# Altium PCB DIO_8SMA_8MCX.PcbDoc (part 5 of 9)
Units mm, origin at the board's own origin, x right, y up, seen from the top; angles counter-clockwise.
Board outline 222.9 x 100 mm, 6 copper layers (TopLayer, L2, L3, L4, L5, Bottom Layer), stack 1.492 mm thick; 542 components, 326 nets, 1968 pads, 1583 vias.
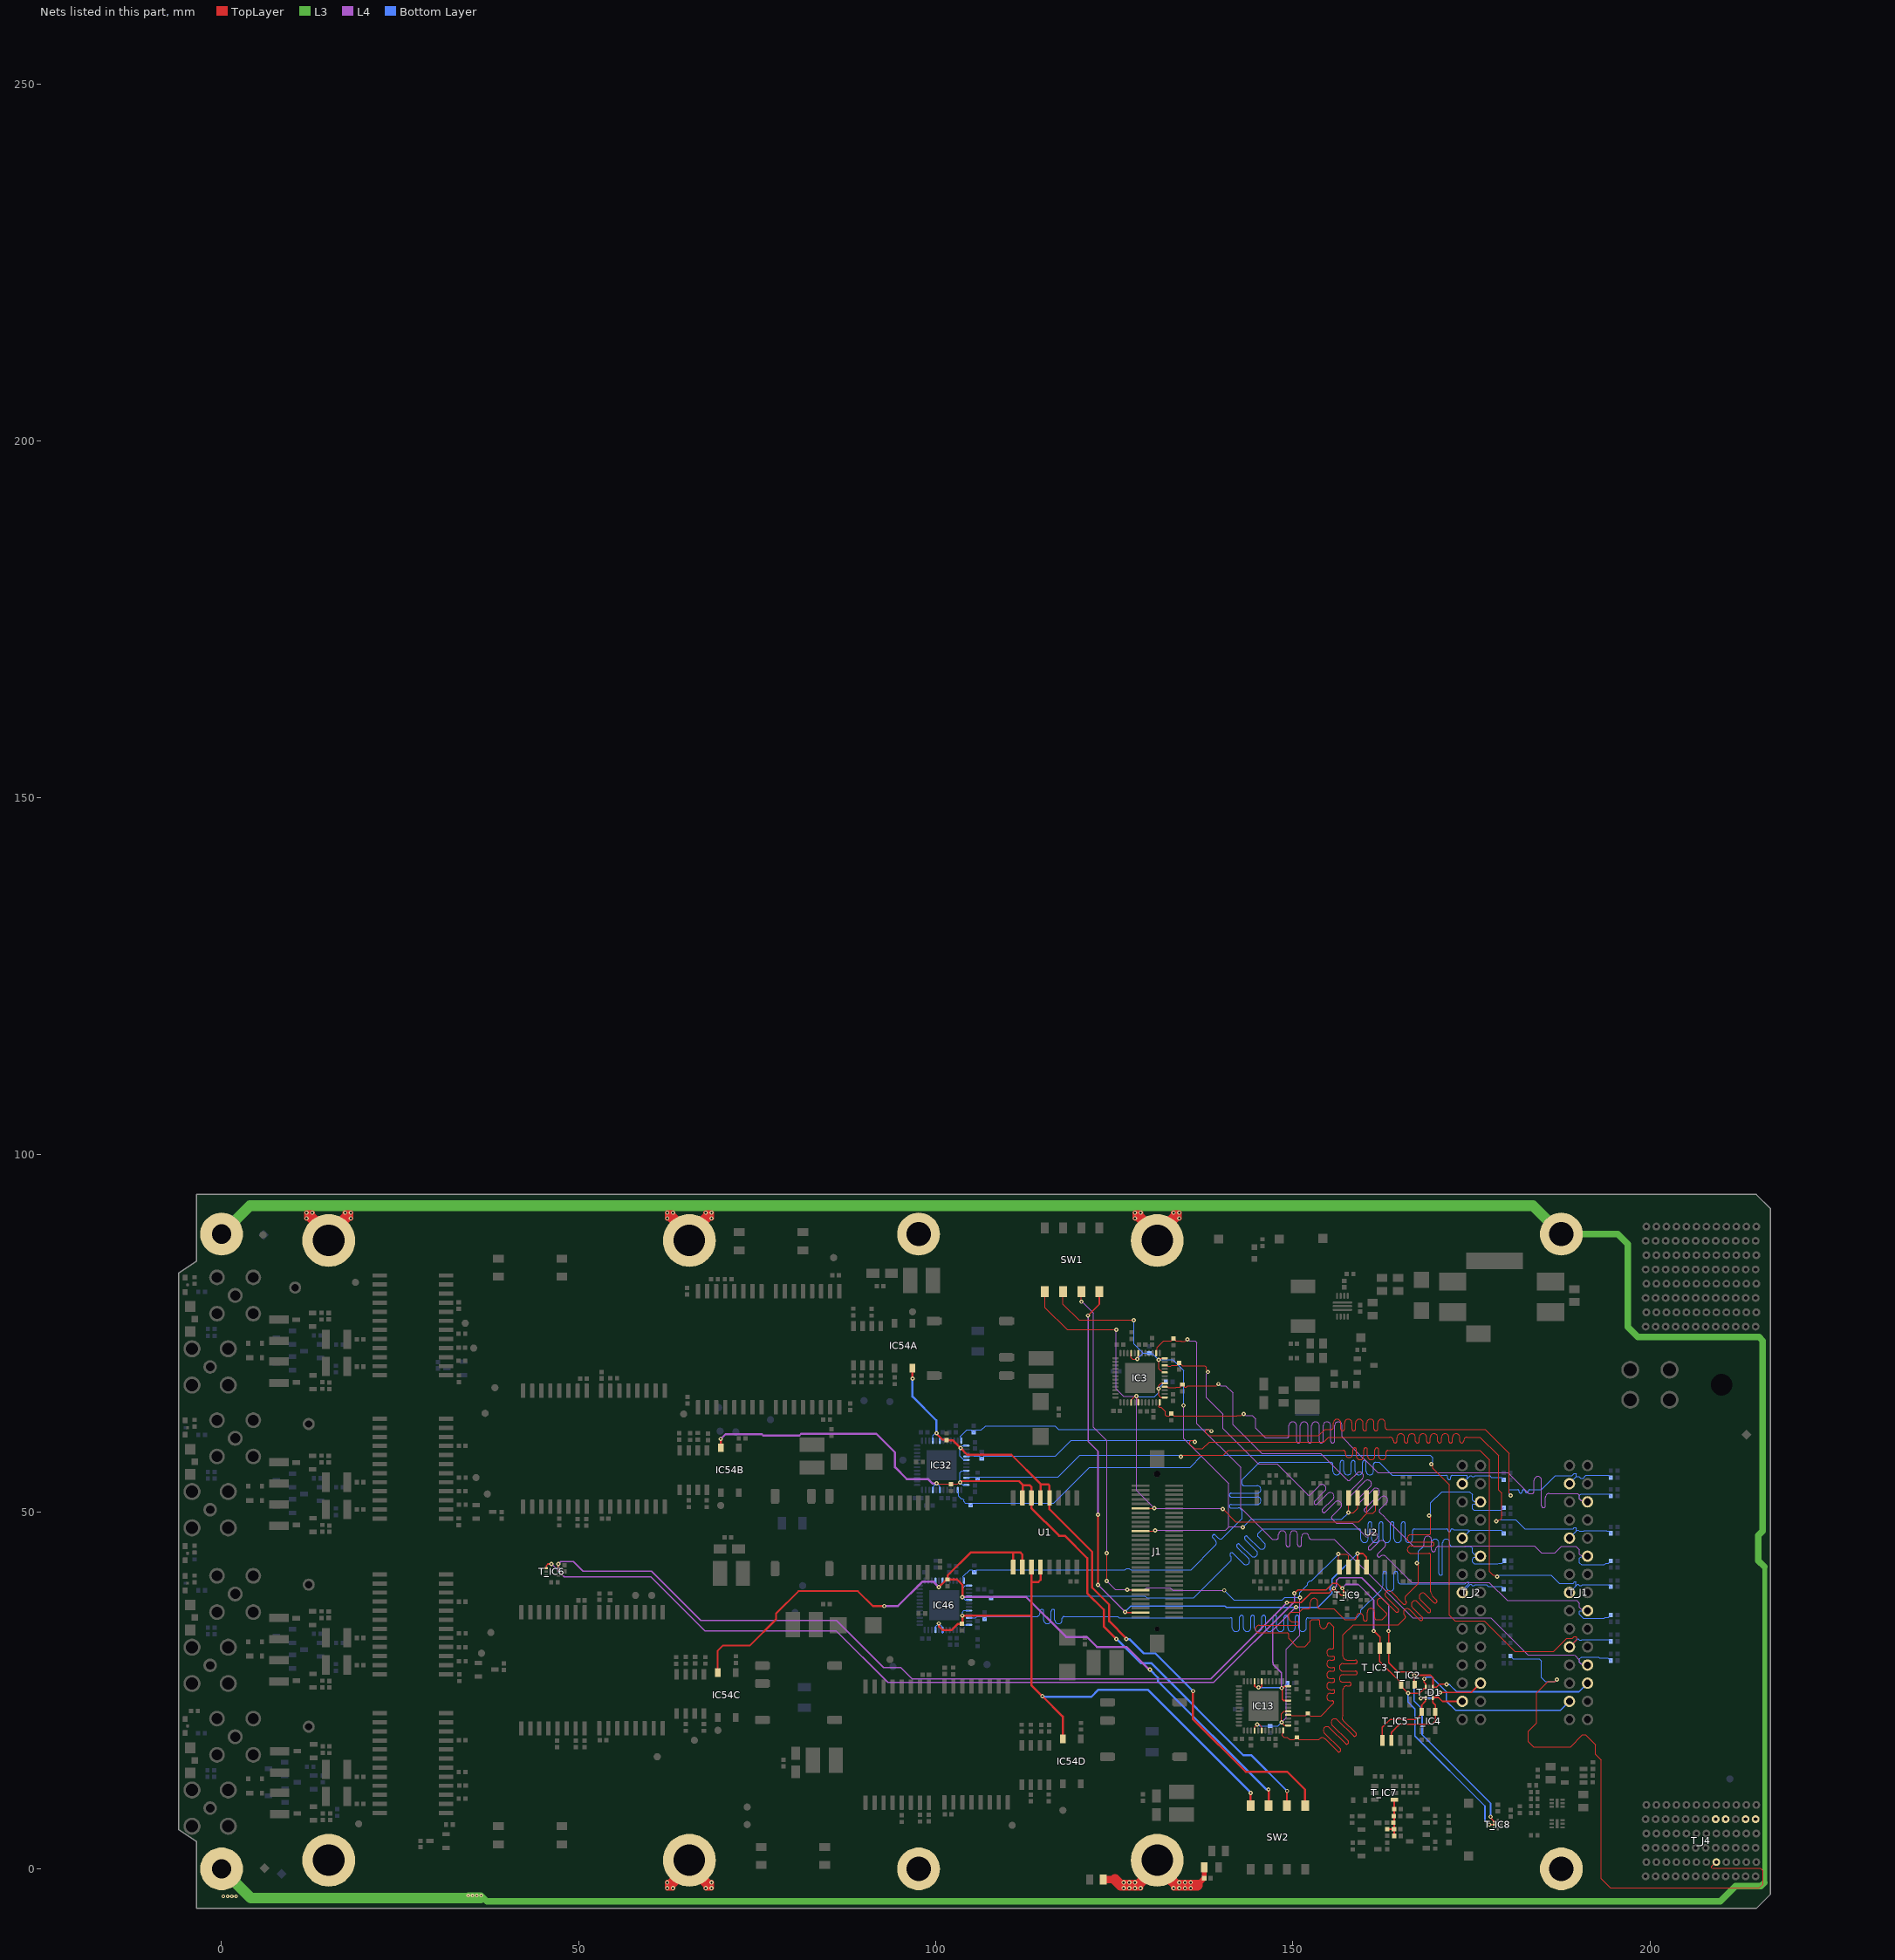
[diagram p8: the nets of this part, all layers, seen from the top]

## Via types
v1: diameter 0.6, hole 0.25, TopLayer to Bottom Layer, tented both sides, 1359 vias
v2: diameter 0.5, hole 0.2, TopLayer to Bottom Layer, tented both sides, 127 vias
v3: diameter 0.6, hole 0.3, TopLayer to Bottom Layer, tented both sides, 45 vias
v4: diameter 0.8, hole 0.3, TopLayer to Bottom Layer, tented both sides, 40 vias
v5: diameter 0.5, hole 0.25, TopLayer to Bottom Layer, tented both sides, 12 vias

## Nets (pads, with @x,y where several pads share a name; then routed paths per layer and width w, separated by ;. In a path a pad name is that pad's centre, name@x,y a point inside that pad or via, vN(x,y) a via of type N, cw(c..) or ccw(c..) an arc to the next point about the centre after c; other vN are vias at no path point) (continued)
BP_IO.LVDS_P15: T_J4.E2 T_R50.2 | length 84.2
  TopLayer w0.116: v1(187,26.52) 186.994,26.52 186.71,26.236 185.736,26.236 184.164,24.664 184.164,20.427 183,19.263 183,17.8 183.716,17.084 188.582,17.084 188.587,17.079 188.879,17.079 190.573,18.773 190.993,18.773 192.367,17.399 192.367,16.063 193.2,15.23 193.2,-1.401 194.47,-2.671 215.293,-2.671 215.816,-2.148 215.816,-0.252 215.464,0.1 208.726,0.1 208.658,0.168 208.658,0.308 T_J4.E2@209.3,0.95
  Bottom Layer w0.116: T_R50.2@180.47,29.8 180.47,29.78 180.702,29.548 180.722,29.548 180.854,29.416 184.485,29.416 184.8,29.101 184.8,26.786 185.368,26.218 186.698,26.218 v1(187,26.52)
BP_MGT_Rx_N: T_J4.E5
BP_MGT_Rx_P: T_J4.D5
BP_MGT_Tx_N: T_J4.B5
BP_MGT_Tx_P: T_J4.A5
CHASSIS: MP1.1 MP2.1 MP3.1 MP4.1 MP5.1 MP6.1 T_B1.1 T_B2.1 T_C12.1 T_M1.1 T_M2.1 T_M3.1 T_M4.1 T_R26.1 T_R28.2 | length 614.3
  TopLayer w0.7: 127.9,-2.3 v3(127.9,-2.7) v3(128.7,-2.7) 128.3,-2.3 v3(127.9,-1.9) ; MP6.1@129.368,-1.493 131.592,-1.493 131.994,-1.895 132.62,-1.269 132.669,-1.269 MP6.1@132.908,-1.269 ; MP6.1@131,0 MP6.1@131.2,0.2 ; 136.611,-2.3 T_C12.1@137.596,-1.314 ; T_C12.1@137.6,-1.311 T_R26.1@137.6,0.2 ; v3(11.9,91.1) 12.3,91.5 v3(12.7,91.9) v3(11.9,91.9) v3(11.9,91.1) ; v3(17.3,91.9) 17.7,91.5 v3(18.1,91.1) v3(18.1,91.9) v3(17.3,91.9) ; v3(62.4,-2.7) v3(63.2,-2.7) 62.8,-2.3 v3(62.4,-1.9) v3(62.4,-2.7) ; v3(62.4,91.1) 62.8,91.5 v3(63.2,91.9) v3(62.4,91.9) v3(62.4,91.1) ; v3(67.8,-2.7) 68.2,-2.3 v3(68.6,-1.9) v3(68.6,-2.7) v3(67.8,-2.7) ; v3(67.8,91.9) 68.2,91.5 v3(68.6,91.1) v3(68.6,91.9) v3(67.8,91.9) ; v3(127.9,91.1) 128.3,91.5 v3(128.7,91.9) v3(127.9,91.9) v3(127.9,91.1) ; v3(133.3,-2.7) 133.7,-2.3 v3(134.1,-1.9) 134.1,-2.3 v3(134.1,-2.7) v3(133.3,-2.7) ; v3(133.3,91.9) 133.7,91.5 v3(134.1,91.1) v3(134.1,91.9) v3(133.3,91.9)
  TopLayer w0.9: MP1.1@13.756,-1.244 15,0 MP1.1@16.244,-1.244
  TopLayer w1: T_R28.2@123.45,-1.5 125.1,-1.5
  TopLayer w1.2: 133.7,-2.3 134.1,-2.3
  TopLayer w1.5: 12.3,91.5 15,88.8 17.7,91.5 ; 62.8,-2.3 65.5,0.4 68.2,-2.3 ; 62.8,91.5 65.5,88.8 68.2,91.5 ; 125.1,-1.5 125.9,-2.3 127.9,-2.3 ; 128.3,-2.3 131,0.4 131.2,0.2 132.669,-1.269 133.7,-2.3 ; 128.3,91.5 131,88.8 133.7,91.5 ; 134.1,-2.3 135.7,-2.3 136.611,-2.3
  L3 w0.7: 216.05,-1.911 216.077,-1.884 216.077,42.248 216.05,42.275
  L3 w0.9: v2(34.543,-3.75) v2(35.143,-3.75) v2(35.743,-3.75) v2(36.343,-3.75) 37.143,-4.55 209.85,-4.55 211.975,-2.425 215.536,-2.425 216.05,-1.911 ; T_M3.1@97.6,0 97.665,-0.065 T_M3.1@97.665,-0.566 ; T_M2.1@186.782,88.9 T_M2.1@187.6,88.9 195.5,88.9 196.9,87.5 196.9,75.904 198.304,74.5 215.273,74.5 215.8,73.973 215.8,47.329 215.18,46.709 215.18,43.172 216.05,42.302 216.05,42.275
  L3 w1.5: T_B1.1@0,0 4.092,-4.092 35.143,-4.092 36.254,-4.092 ; T_B2.1@0,88.9 3.97,92.87 67.8,92.87 127.9,92.87 183.63,92.87 T_M2.1@187.6,88.9
  other v2: 0.243,-3.85 0.843,-3.85 1.443,-3.85 2.043,-3.85
  other v3: 126.3,-2.7 127.1,-2.7 134.9,-2.7 135.7,-2.7 126.3,-1.9 127.1,-1.9 134.9,-1.9 135.7,-1.9
CT: T_C14.2 T_C15.2 T_C16.2 T_C17.2 T_C18.2 T_C19.2 T_IC7.4 | length 6.3
  TopLayer w0.25: T_C14.2@163.2,5.55 164.047,5.55 T_C18.2@164.172,5.425 ; T_IC7.4@164.2,9.683 164.172,9.655 T_C18.2@164.172,5.425 ; T_C19.2@164.216,4.463 164.216,5.381 T_C18.2@164.172,5.425
DIR_CTRL1: IC32.1 IC32.5 IC32.40 IC32.42 IC54A.3 R59.1 SW2.5 U1.4 U1.5 | length 101.5
  TopLayer w0.3: v1(96.751,68.676) IC54A.3@96.751,70.127 ; v1(100.093,61.042) 100.15,60.985 100.15,60.888 100.936,60.102 101.434,60.102 R59.1@101.503,60.033 ; R59.1@101.528,60.038 102.378,60.038 v1(103.459,58.958) 104.416,58 110.589,58 114.665,53.924 114.665,53.839 ; U1.5@114.665,51.95 114.665,53.839 ; v1(126.7,32.2) 126.7,32.273 124.3,34.673 124.3,36.979 121.9,39.379 121.9,44.4 115.935,50.365 U1.4@115.935,51.95 115.935,53.663 115.759,53.839 114.665,53.839 ; v1(136.029,24.889) 136.029,20.971 143.4,13.6 149.2,13.6 151.71,11.09 SW2.5@151.71,8.85
  Bottom Layer w0.15: IC32.40@99.593,59.958 99.593,60.693 99.856,60.956 100.007,60.956 v1(100.093,61.042) 100.11,61.042 100.593,60.56 IC32.42@100.593,59.958 ; IC32.5@104.293,57.258 103.958,57.258 103.408,57.808 103.408,58.908 v1(103.459,58.958) 103.758,59.258 IC32.1@104.293,59.258
  Bottom Layer w0.3: v1(96.751,68.676) 96.751,66.149 100.093,62.807 v1(100.093,61.042) ; v1(126.7,32.2) 126.73,32.17 127.13,32.17 129.128,30.172 130.746,30.172 v1(136.029,24.889)
DIR_CTRL2: IC32.8 IC32.12 IC32.19 IC32.21 IC54B.3 R58.1 SW2.6 U1.6 U1.7 | length 119.4
  TopLayer w0.15: v1(100.097,53.981) 100.219,53.981 100.322,53.878 R58.1@102.108,53.878 102.128,53.878 103.096,53.878 103.326,54.108 v1(103.408,54.108)
  TopLayer w0.3: IC54B.3@69.899,58.98 69.899,60.199 v1(69.9,60.2) ; R58.1@102.128,53.878 R58.1@102.268,54.018 ; v1(103.408,54.108) 103.49,54.108 103.681,54.3 111.662,54.3 112.219,53.743 ; U1.7@112.125,51.95 112.2,52.025 112.2,53.713 ; 112.2,53.724 112.2,53.713 ; v1(125.3,32.2) 123.52,33.98 123.52,36.308 121.211,38.617 121.211,43.522 118.088,46.645 117.268,46.645 113.395,50.519 U1.6@113.395,51.95 113.395,53.505 113.187,53.713 112.2,53.713 ; SW2.6@149.17,8.85 149.17,10.87 v1(149.2,10.9)
  L4 w0.3: v1(69.9,60.2) 70.57,60.87 75.648,60.87 75.833,60.685 80.91,60.685 81.15,60.925 91.675,60.925 94.3,58.3 94.3,56.24 95.94,54.6 98.9,54.6 99.519,53.981 v1(100.097,53.981)
  Bottom Layer w0.15: IC32.21@99.593,53.058 99.621,53.087 99.621,53.505 v1(100.097,53.981) 100.564,53.514 100.564,53.087 IC32.19@100.593,53.058 100.583,53.049 IC32.19@100.583,52.669 ; IC32.12@104.293,53.758 103.758,53.758 v1(103.408,54.108) 103.408,55.508 103.658,55.758 IC32.8@104.293,55.758
  Bottom Layer w0.3: v1(125.3,32.2) 125.346,32.2 128.724,28.822 130.166,28.822 143.088,15.9 144.2,15.9 v1(149.2,10.9)
DIR_CTRL3: IC46.1 IC46.5 IC46.40 IC46.42 IC54C.3 R101.1 SW2.7 U1.9 U1.10 | length 124.8
  TopLayer w0.25: IC54C.3@69.462,27.487 69.462,30.562 70.2,31.3 74,31.3 77.636,34.936 77.636,35.759 80.777,38.9 89.1,38.9 91.2,36.8 v1(92.8,36.8)
  TopLayer w0.3: v1(100.446,39.461) 101.366,40.381 101.521,40.381 R101.1@101.661,40.521 ; v1(103.746,38.061) 103.746,39.761 102.986,40.521 R101.1@101.661,40.521 ; U1.9@110.841,42.264 110.841,44.297 ; 110.897,44.241 110.841,44.297 ; U1.10@112.125,42.25 112.125,44.024 111.849,44.3 110.841,44.3 110.841,44.297 ; v1(146.577,11.1) 146.63,11.047 SW2.7@146.63,8.85 ; R101.1@101.661,40.521 101.67,40.531 101.67,41.086 104.885,44.3 110.626,44.3 110.628,44.298 110.84,44.298 110.841,44.297
  L4 w0.3: v1(92.8,36.8) 94.7,36.8 98.1,40.2 99.708,40.2 v1(100.446,39.461) ; v1(103.746,38.061) 112.669,38.061 118.244,32.486 121.161,32.486 122.573,31.075 126.725,31.075 129.75,28.05 129.769,28.05 129.95,27.869 v1@129.95,27.85
  Bottom Layer w0.15: IC46.40@99.959,40.361 99.988,40.333 99.988,39.919 v1(100.446,39.461) 100.888,39.903 100.888,39.949 100.959,40.021 IC46.42@100.959,40.361 ; IC46.5@104.659,37.661 104.651,37.67 104.138,37.67 v1(103.746,38.061) 103.746,39.261 104.138,39.653 104.651,39.653 IC46.1@104.659,39.661
  Bottom Layer w0.3: v1(130,27.9) 131.123,26.777 131.123,26.277 146.242,11.158 146.519,11.158 v1(146.577,11.1)
DIR_CTRL4: IC46.8 IC46.12 IC46.19 IC46.21 IC54D.3 R60.1 SW2.8 U1.11 U1.12 | length 87.5
  TopLayer w0.3: v1(100.446,34.361) 100.476,34.331 100.476,33.931 100.946,33.461 102.246,33.461 103.063,34.278 103.593,34.278 R60.1@103.646,34.331 ; R60.1@103.57,34.421 103.746,34.597 v1(103.746,35.461) 113.395,35.461 ; U1.11@113.395,42.25 113.395,40.188 ; U1.12@114.665,42.25 114.665,40.465 114.388,40.188 113.395,40.188 ; IC54D.3@117.78,18.218 117.78,21.329 v1(114.933,24.177) 114.923,24.177 113.395,25.705 113.395,35.461 ; SW2.8@144.09,8.85 144.09,10.621 v1(144.107,10.638) ; 113.395,35.461 113.395,40.188
  Bottom Layer w0.15: IC46.21@99.959,33.461 99.988,33.49 99.988,33.903 v1(100.446,34.361) 100.888,33.92 100.888,33.874 100.959,33.802 IC46.19@100.959,33.461 ; IC46.12@104.659,34.161 103.946,34.161 103.746,34.361 v1(103.746,35.461) 103.746,35.961 103.946,36.161 IC46.8@104.659,36.161
  Bottom Layer w0.3: IC46.19@100.959,33.161 IC46.19@100.959,33.461 ; v1(114.933,24.177) 114.99,24.12 115.202,24.12 115.222,24.1 121.8,24.1 122.8,25.1 129.675,25.1 v1@144.107,10.668
DIR_CTRL5: IC3.1 IC3.5 IC3.40 IC3.42 J1.11 R4.1 SW1.1 U2.4 U2.5 | length 91.1
  TopLayer w0.15: SW1.1@115.3,80.84 115.3,78.6 118.395,75.505 v1(125.277,75.505) ; IC3.40@127.358,65.317 127.358,65.657 IC3.40@127.433,65.732 ; IC3.40@127.433,65.733 127.803,66.103 128.011,66.103 v1(128.097,66.189) 128.097,66.109 128.33,65.876 128.33,65.345 IC3.42@128.358,65.317 ; J1.11@128.65,50.483 130.582,50.483 v1(130.6,50.5) ; IC3.1@132.058,66.017 131.483,66.017 131.218,66.282 v1(131.218,67.255) 131.218,67.718 131.517,68.017 IC3.5@132.058,68.017 ; v1(140.2,50.4) 142,48.6 159.2,48.6 160.4,49.8 ; U2.5@160.333,51.95 160.4,51.883 160.4,49.8 ; U2.4@161.603,51.95 161.603,50.201 161.223,49.821 160.421,49.821 160.4,49.8
  L4 w0.15: v1(125.277,75.505) 125.277,67.223 126.311,66.189 v1(128.097,66.189) 128.097,53.003 v1(130.6,50.5) 139.978,50.5 140.078,50.4 v1(140.2,50.4)
  Bottom Layer w0.15: v1(128.097,66.189) 128.151,66.134 130.634,66.134 131.218,66.718 v1(131.218,67.255) 131.218,67.318 131.865,67.965 132.015,67.965 132.23,68.18 R4.1@132.23,68.2
DIR_CTRL6: IC3.8 IC3.12 IC3.19 IC3.21 J1.21 R7.1 SW1.2 U2.6 U2.7 | length 91.2
  TopLayer w0.15: SW1.2@117.83,80.85 117.83,79.07 120.038,76.862 v1(127.738,76.862) ; IC3.21@127.358,72.217 127.358,71.642 127.6,71.4 v1(128.2,71.4) 128.358,71.558 IC3.19@128.358,72.217 ; J1.21@128.65,47.308 130.486,47.308 130.578,47.4 v1(130.7,47.4) ; IC3.8@132.058,69.517 131.77,69.517 131.248,70.04 131.248,71.252 v1(131.2,71.3) 131.322,71.3 131.51,71.488 132.03,71.488 IC3.12@132.058,71.517 ; U2.7@157.793,51.95 157.8,51.943 v1(157.8,49.9) 158.5,49.9 159.063,50.463 U2.6@159.063,51.95
  L4 w0.15: v1(130.7,47.4) 140.571,47.4 141.071,47.9 ; v1@134.746,64.9 134.746,60.254 141.034,53.966 141.034,47.9 142.672,47.9 142.678,47.894 142.898,47.894 v1(142.985,47.808)
  Bottom Layer w0.15: v1(127.738,76.862) 127.738,73.522 129.03,72.23 ; v1(128.2,71.4) 129.03,72.23 ; v1(134.7,64.9) 134.7,69.8 133.2,71.3 v1(131.2,71.3) 130.347,72.153 129.977,72.153 R7.1@129.9,72.23 129.03,72.23 ; v1(142.985,47.808) 144.126,48.949 156.849,48.949 v1(157.8,49.9)
DIR_CTRL7: IC13.1 IC13.5 IC13.40 IC13.42 J1.47 R25.1 SW1.3 U2.9 U2.10 | length 113.9
  TopLayer w0.15: SW1.3@120.37,80.85 120.37,79.47 v1(120.406,79.434) ; v1(123.941,40.309) 123.949,40.317 v1(123.949,44.216) ; v1(126.8,39.1) 126.848,39.053 J1.47@128.65,39.053 ; IC13.40@144.65,19.369 144.675,19.394 144.675,19.875 v1@145.019,20.219 ; v1(145.018,20.223) 145.022,20.219 145.319,20.219 145.644,19.894 145.644,19.375 IC13.42@145.65,19.369 ; IC13.1@149.35,20.069 149.325,20.094 148.844,20.094 v1(148.419,20.519) 148.419,21.719 148.769,22.069 IC13.5@149.35,22.069 ; U2.9@156.523,42.25 156.4,42.373 v1(156.4,44.1) 157.5,44.1 157.8,43.8 157.8,42.257 U2.10@157.793,42.25
  L4 w0.15: v1(120.406,79.434) 120.483,79.434 122.083,77.833 122.083,61.815 123.949,59.95 v1(123.949,44.216) ; v1(123.941,40.309) 125.149,39.1 v1(126.8,39.1) 129.22,39.1 129.515,39.395 132.805,39.395 133.2,39 v1(140.4,39) ; v1(148.419,20.519) 149.079,21.179 149.079,30.779 151,32.7 v1(151,38)
  Bottom Layer w0.15: v1(140.4,39) 141.766,37.634 148.534,37.634 148.9,38 v1(151,38) 151,38.717 152.073,39.789 152.073,40.051 152.363,40.341 152.624,40.341 156.383,44.1 v1(156.4,44.1) ; v1(145.018,20.223) 145.096,20.223 145.331,19.989 R25.1@146.819,19.989 147.889,19.989 v1(148.419,20.519)
DIR_CTRL8: IC13.8 IC13.12 IC13.19 IC13.21 J1.57 R8.1 SW1.4 U2.11 U2.12 | length 115.8
  TopLayer w0.2: v1(121.325,77.487) 122.91,79.072 SW1.4@122.91,80.85 ; v1(122.702,39.764) 122.711,39.773 v1(122.711,49.577) ; v1(126.5,36) 126.608,36 126.731,35.878 J1.57@128.65,35.878 ; IC13.21@144.65,26.269 144.65,25.588 144.819,25.419 145.157,25.419 v1(145.177,25.4) ; v1@145.177,25.419 145.533,25.419 145.65,25.536 IC13.19@145.65,26.269 ; IC13.8@149.35,23.569 148.669,23.569 148.519,23.719 148.519,25.219 148.85,25.55 149.331,25.55 IC13.12@149.35,25.569 ; U2.11@159.063,42.25 159.063,44.16 v1(159.065,44.161) 159.833,44.161 160.333,43.661 U2.12@160.333,42.25
  L4 w0.2: v1(121.325,77.487) 121.325,59.875 122.711,58.489 v1(122.711,49.577) ; v1(122.702,39.764) 122.736,39.764 v1(126.5,36) ; v1(148.419,25.319) 148.419,27.452 147.252,28.619 147.252,28.851 147.199,28.904 147.199,33.421 v1(150.449,36.671)
  Bottom Layer w0.2: v1(126.5,36) 127.322,36.822 140.478,36.822 140.7,36.6 150.378,36.6 v1(150.449,36.671) 150.52,36.6 153.5,36.6 155.5,38.6 155.5,38.783 155.219,39.064 155.219,39.495 155.5,39.776 155.5,40.596 v1(159.065,44.161) ; v1(145.177,25.4) 148.23,25.4 148.311,25.319 v1(148.419,25.319) 148.495,25.396 148.625,25.396 149.039,25.809 149.059,25.809 149.249,25.999 R8.1@149.249,26.019
EEM0_I2C.SCL: T_D1.3 T_IC2.1 T_IC3.6 T_IC6.1 T_IC8.3 T_IC9.6 T_J1.27 | length 198.6
  TopLayer w0.2: T_IC6.1@45.462,42.1 45.462,42.462 45.7,42.7 v1(46.2,42.7) ; v1(150.229,38.607) 150.663,39.042 154.62,39.042 155.578,40 156.192,40 156.891,39.301 v1@156.9,39.301 ; v1(156.929,39.301) v1@156.9,39.301 ; T_IC9.6@157.2,38.675 157.159,38.675 157.109,38.725 157.109,38.983 157.084,39.008 157.084,39.038 156.9,39.222 v1@156.9,39.301 ; v1(161.345,33.316) 162.2,32.461 162.2,30.94 T_IC3.6@162.16,30.9 162.16,29.06 164.95,26.27 164.95,26 T_IC2.1@165.15,25.8 165.15,25.55 165.35,25.35 165.389,25.35 v1(166.139,24.6) 167.74,24.6 168.385,25.245 168.55,25.245 168.6,25.295 T_D1.3@168.6,25.46 168.588,25.472 168.588,25.937 168.4,26.125 v1(168.4,26.6) ; v1(177.5,6.2) T_IC8.3@178.225,6.2
  L4 w0.2: v1(46.2,42.7) 48,40.9 60.1,40.9 67.7,33.3 86.1,33.3 93.3,26.1 138.9,26.1 150.229,37.429 v1(150.229,38.607) ; v1(156.929,39.301) 156.929,39.329 157.42,39.82 159.173,39.82 161.329,37.665 161.329,33.332 v1(161.345,33.316)
  Bottom Layer w0.2: v1(166.139,24.6) 166.139,23.361 167.1,22.4 167.1,18.6 176.9,8.8 176.9,6.8 v1(177.5,6.2) ; v1(168.4,26.6) 168.47,26.6 168.717,26.847 169.452,26.847 171.5,24.799 171.5,23.5 172.8,22.2 187.47,22.2 T_J1.27@188.73,23.46
EEM0_I2C.SDA: T_D1.1 T_IC2.3 T_IC3.5 T_IC6.6 T_IC8.2 T_IC9.7 T_J1.26 | length 199.5
  TopLayer w0.2: T_IC6.6@47.138,42.1 47.144,42.106 47.144,42.681 v1(47.15,42.686) ; v1(149.186,37.286) 151.17,37.286 152.518,38.634 155.094,38.634 v1(155.739,39.279) 155.798,39.279 156.752,38.325 157.175,38.325 T_IC9.7@157.2,38.3 ; v1(163.411,33.316) 163.43,33.297 T_IC3.5@163.43,30.9 163.43,28.87 164.708,27.592 166.508,27.592 v1(166.98,27.12) ; T_IC2.3@167.05,25.8 166.98,25.87 v1(166.98,27.12) ; v1(171.523,25.861) 170.561,25.861 170.16,25.46 T_D1.1@169.6,25.46 169.638,25.498 169.638,26.794 169.311,27.12 v1(166.98,27.12) ; v1(177.7,7.3) 177.777,7.223 177.777,7.048 178.1,6.725 178.1,6.625 178.125,6.6 T_IC8.2@178.225,6.6
  L4 w0.2: v1(47.15,42.686) 47.483,43.02 49.28,43.02 50.6,41.7 60.2,41.7 67.1,34.8 86.1,34.8 92.7,28.2 95.1,28.2 96.7,26.6 138.499,26.6 v1(149.186,37.286) ; v1(155.739,39.279) 155.783,39.279 156.1,39.596 156.1,40.389 156.486,40.775 159.639,40.775 163.411,37.003 v1(163.411,33.316)
  Bottom Layer w0.2: v1(166.98,27.12) 166.98,23.52 168.1,22.4 168.1,18.8 177.7,9.2 v1(177.7,7.3) ; v1(171.523,25.861) 171.6,25.785 171.962,25.785 172.956,24.791 190.061,24.791 T_J1.26@191.27,26
EEM1_I2C.SCL: T_D1.6 T_IC4.1 T_IC5.6 T_J2.27 | length 15.7
  TopLayer w0.2: T_IC5.6@163.795,17.975 163.795,19.095 164.3,19.6 ; 164.25,19.55 164.3,19.6 ; T_D1.6@169.6,23.94 169.6,23.3 169.95,22.95 T_IC4.1@169.95,22 169.95,20.75 169.46,20.26 164.96,20.26 164.3,19.6 ; T_D1.6@169.6,23.95 169.65,24 170.4,24 170.94,23.46 T_J2.27@173.73,23.46
EEM1_I2C.SDA: T_D1.4 T_IC4.3 T_IC5.5 T_J2.26 | length 20.6
  TopLayer w0.2: T_IC5.5@162.525,17.975 162.525,19.819 163.163,20.457 163.606,20.9 167.234,20.9 167.85,21.516 167.85,21.8 T_IC4.3@168.05,22 168.05,22.95 168.575,23.475 168.575,23.915 T_D1.4@168.6,23.94 167.94,23.94 v1(167.9,23.9) ; v1(170.6,24.7) 174.97,24.7 T_J2.26@176.27,26
  Bottom Layer w0.2: v1(167.9,23.9) 169.8,23.9 v1(170.6,24.7)
EEM_IO.LVDS_N0: IC32.48 R64.2 T_J1.3 T_R51.2 | length 120.7
  TopLayer w0.116: v1(138.6,61.3) 138.52,61.3 138.29,61.529 138.05,61.529 138.049,61.53 137.855,61.53 137.787,61.463 137.787,61.143 138.245,60.685 153.615,60.685 154.492,61.561 155.233,61.561 155.421,61.561 ccw(c155.421,61.819) 155.679,61.819 155.679,62.447 cw(c156.198,62.447) 156.717,62.447 156.717,61.605 ccw(c156.975,61.605) 157.233,61.605 157.233,62.447 cw(c157.752,62.447) 158.271,62.447 158.271,61.605 ccw(c158.529,61.605) 158.787,61.605 158.787,62.447 cw(c159.306,62.447) 159.825,62.447 159.825,61.605 ccw(c160.083,61.605) 160.341,61.605 160.341,62.447 cw(c160.86,62.447) 161.379,62.447 161.379,61.605 ccw(c161.637,61.605) 161.895,61.605 161.895,62.447 cw(c162.414,62.447) 162.933,62.447 162.933,61.819 ccw(c163.191,61.819) 163.191,61.561 165.711,61.561 176.936,61.561 180.289,58.208 180.289,52.61 180.519,52.38 v1(180.519,52.3)
  Bottom Layer w0.116: IC32.48@103.593,59.958 103.593,60.299 103.473,60.418 103.473,60.582 104.36,61.47 104.98,61.47 105.048,61.402 105.048,61.362 105.28,61.13 R64.2@105.3,61.13 105.32,61.13 105.552,61.362 105.552,61.402 105.62,61.47 106.408,61.47 106.978,62.039 116.692,62.039 117.201,61.529 137.68,61.529 138.29,61.529 138.52,61.3 v1(138.6,61.3) ; v1@180.289,52.417 180.289,52.5 ; v1(180.519,52.3) 180.489,52.3 180.289,52.5 ; T_J1.3@188.73,53.94 189.713,54.923 ; T_R51.2@194.53,54.8 194.298,55.032 194.298,55.077 194.23,55.144 193.835,55.144 193.788,55.098 191.045,55.098 190.665,54.718 190.307,54.718 190.063,54.963 189.753,54.963 189.713,54.923 ; 180.289,52.5 180.289,53.032 180.357,53.1 181.017,53.1 181.491,53.1 cw(c181.491,52.892) 181.699,52.892 181.699,52.824 ccw(c181.907,52.824) 181.907,52.616 ccw(c181.907,52.824) 182.115,52.824 182.115,52.892 cw(c182.323,52.892) 182.323,53.1 cw(c182.323,52.892) 182.531,52.892 ccw(c182.739,52.892) 182.739,52.684 ccw(c182.739,52.892) 182.947,52.892 cw(c183.155,52.892) 183.155,53.1 183.671,53.1 184.787,53.1 186.777,55.09 189.092,55.09 189.383,55.381 189.645,55.381 189.713,55.313 189.713,54.923
EEM_IO.LVDS_N1: IC3.48 R6.2 T_J1.6 T_R52.2 | length 107.1
  TopLayer w0.116: IC3.48@131.358,65.317 131.358,64.967 131.239,64.847 131.239,64.693 131.307,64.625 131.575,64.625 132.142,64.058 132.142,63.565 132.277,63.431 132.68,63.431 132.748,63.498 132.748,63.538 132.98,63.77 R6.2@133,63.77 133.02,63.77 133.252,63.538 133.252,63.498 133.32,63.431 142.181,63.431 142.241,63.491 142.79,63.491 143.02,63.72 v1(143.1,63.72)
  L4 w0.127: v1(143.1,63.72) 143.187,63.72 143.411,63.496 144.304,63.496 144.8,63 144.8,61.729 146.157,60.372 148.985,60.372 149.184,60.372 ccw(c149.184,60.635) 149.448,60.635 149.448,62.062 cw(c149.983,62.062) 149.983,62.597 cw(c149.983,62.062) 150.519,62.062 150.519,59.894 ccw(c150.782,59.894) 150.782,59.63 ccw(c150.782,59.894) 151.046,59.894 151.046,62.062 cw(c151.581,62.062) 151.581,62.597 cw(c151.581,62.062) 152.117,62.062 152.117,59.894 ccw(c152.38,59.894) 152.38,59.63 ccw(c152.38,59.894) 152.644,59.894 152.644,62.062 cw(c153.179,62.062) 153.179,62.597 cw(c153.179,62.062) 153.715,62.062 153.715,59.894 ccw(c153.978,59.894) 153.978,59.63 ccw(c153.978,59.894) 154.242,59.894 154.242,62.062 cw(c154.777,62.062) 154.777,62.597 cw(c154.777,62.062) 155.313,62.062 155.313,59.894 ccw(c155.576,59.894) 155.576,59.63 ccw(c155.576,59.894) 155.84,59.894 155.84,62.062 cw(c156.375,62.062) 156.375,62.597 cw(c156.375,62.062) 156.911,62.062 156.911,60.583 ccw(c157.174,60.583) 156.988,60.397 157.767,59.617 157.831,59.554 161.917,55.468 180.117,55.468 183.013,52.572 183.305,52.572 183.504,52.572 ccw(c183.504,52.836) 183.768,52.836 183.768,54.41 cw(c184.303,54.41) 184.303,54.945 cw(c184.303,54.41) 184.839,54.41 184.839,50.842 ccw(c185.102,50.842) 185.102,50.578 ccw(c185.102,50.842) 185.366,50.842 185.366,52.037 cw(c185.901,52.037) 185.901,52.572 186.954,52.572 189.902,52.572 190.136,52.338 190.136,51.8 190.354,51.582 191.088,51.582 T_J1.6@191.27,51.4
  Bottom Layer w0.116: T_J1.6@191.27,51.4 191.104,51.567 190.364,51.567 190.131,51.8 190.131,52.3 190.36,52.53 194.23,52.53 194.298,52.462 194.298,52.432 T_R52.2@194.53,52.2
EEM_IO.LVDS_N2: IC32.4 R71.2 T_J1.9 T_R53.2 | length 120.8
  TopLayer w0.116: v1(136.3,59.78) 136.22,59.78 135.99,60.01 135.765,60.01 135.605,59.85 135.605,59.478 136.231,58.853 137.363,58.853 138.295,59.785 154.315,59.785 154.992,60.461 162.804,60.461 163.555,60.461 cw(c163.555,59.942) 164.074,59.942 164.074,59.925 ccw(c164.332,59.925) 164.59,59.925 164.59,60.408 cw(c165.109,60.408) 165.628,60.408 165.628,59.91 ccw(c165.886,59.91) 166.144,59.91 166.144,60.408 cw(c166.663,60.408) 167.182,60.408 167.182,59.91 ccw(c167.44,59.91) 167.698,59.91 167.698,60.408 cw(c168.217,60.408) 168.736,60.408 168.736,59.91 ccw(c168.994,59.91) 169.252,59.91 169.252,60.408 cw(c169.771,60.408) 170.29,60.408 170.29,59.91 ccw(c170.548,59.91) 170.806,59.91 170.806,60.408 cw(c171.325,60.408) 171.844,60.408 171.844,59.91 ccw(c172.102,59.91) 172.36,59.91 172.36,60.408 cw(c172.879,60.408) 173.398,60.408 173.398,59.91 ccw(c173.656,59.91) 173.914,59.91 173.914,59.942 cw(c174.433,59.942) 174.433,60.461 174.621,60.461 176.208,60.461 178.815,57.854 178.815,53.054 179.261,52.608 179.261,49.479 179.27,49.47 179.27,49.121 179.049,48.9 178.81,48.9 178.58,48.671 v1(178.5,48.671)
  Bottom Layer w0.116: IC32.4@104.293,57.758 104.633,57.758 104.753,57.878 105.218,57.878 105.311,57.785 106.123,57.785 106.191,57.717 106.191,57.677 R71.2@106.423,57.445 ; R71.2@106.443,57.445 106.463,57.445 106.695,57.677 106.695,57.717 106.763,57.785 116.754,57.785 118.979,60.01 135.99,60.01 136.22,59.78 v1(136.3,59.78) ; v1(178.5,48.671) 178.631,48.671 178.86,48.9 181.231,48.9 182.51,47.621 189.243,47.621 189.393,47.771 189.635,47.771 189.703,47.703 189.703,47.293 ; T_J1.9@188.73,46.32 189.703,47.293 ; T_R53.2@194.53,47 194.53,47.02 194.23,47.319 193.945,47.319 193.888,47.376 190.805,47.376 190.733,47.304 190.101,47.304 189.956,47.45 189.86,47.45 189.703,47.293
EEM_IO.LVDS_N3: IC3.4 R12.2 T_J1.12 T_R54.2 | length 106.1
  TopLayer w0.116: IC3.4@132.058,67.517 132.399,67.517 132.518,67.397 133.613,67.397 133.704,67.488 134.222,67.488 134.29,67.556 134.29,67.596 134.522,67.828 R12.2@134.542,67.828 134.562,67.828 134.794,67.596 134.794,67.556 134.862,67.488 135.106,67.488 135.285,67.667 139.29,67.667 v1@139.366,67.743
  L4 w0.127: v1(139.6,67.896) 139.676,67.896 139.9,67.672 140.613,67.672 141.6,66.685 141.6,62.24 145.668,58.172 153.928,58.172 157.508,54.592 157.609,54.491 157.649,54.451 ccw(c157.835,54.638) 158.021,54.451 159.02,55.45 159.025,55.45 cw(c159.359,55.031) 159.737,55.41 cw(c159.359,55.031) 159.737,54.653 157.791,52.707 ; 157.791,52.334 cw(c157.977,52.52) 157.791,52.706 ; 157.791,52.333 ccw(c157.977,52.52) 158.163,52.333 160.15,54.32 160.155,54.32 cw(c160.489,53.901) 160.867,54.28 cw(c160.489,53.901) 160.867,53.523 158.921,51.577 ; 158.921,51.204 cw(c159.107,51.39) 158.921,51.576 ; 158.921,51.203 ccw(c159.107,51.39) 159.293,51.203 161.28,53.19 161.285,53.19 cw(c161.619,52.771) 161.997,53.15 cw(c161.619,52.771) 161.997,52.393 160.051,50.447 ; 160.051,50.446 ccw(c160.237,50.26) 160.051,50.074 ccw(c160.237,50.26) 160.423,50.073 162.41,52.06 162.414,52.06 cw(c162.749,51.641) 163.127,52.02 cw(c162.749,51.641) 163.127,51.263 162.169,50.304 ccw(c162.355,50.118) 162.168,49.932 162.799,49.301 162.9,49.2 166.9,45.2 167.908,45.2 168.107,45.2 ccw(c168.107,45.463) 168.371,45.463 168.371,46.05 cw(c168.906,46.05) 168.906,46.585 cw(c168.906,46.05) 169.442,46.05 169.442,44.664 ccw(c169.705,44.664) 169.705,44.401 ccw(c169.705,44.664) 169.969,44.664 cw(c170.504,44.665) 170.504,45.2 172.142,45.2 174.1,45.2 174.15,45.25 183.822,45.25 184.8,44.272 186.714,44.272 187.628,45.185 189.653,45.185 190.136,44.703 190.136,44.1 190.354,43.882 191.168,43.882 T_J1.12@191.27,43.78
  Bottom Layer w0.116: T_J1.12@191.27,43.78 191.224,43.733 190.364,43.733 190.131,43.5 190.131,42.869 190.41,42.59 193.621,42.59 193.825,42.793 194.23,42.793 194.298,42.861 194.298,42.893 T_R54.2@194.53,43.125
EEM_IO.LVDS_N4: IC32.10 R76.2 T_J1.15 T_R55.2 | length 121
  TopLayer w0.116: v1(134.3,57.7) 134.38,57.7 134.61,57.929 140.306,57.929 140.976,58.6 156.331,58.6 157.096,58.6 cw(c157.096,58.342) 157.354,58.342 157.354,58.129 ccw(c157.873,58.129) 158.392,58.129 158.392,58.7 cw(c158.65,58.7) 158.908,58.7 158.908,57.825 ccw(c159.427,57.825) 159.946,57.825 159.946,58.7 cw(c160.204,58.7) 160.462,58.7 160.462,57.825 ccw(c160.981,57.825) 161.499,57.825 161.499,58.7 cw(c161.757,58.7) 162.015,58.7 162.015,57.825 ccw(c162.534,57.825) 163.053,57.825 163.053,58.342 cw(c163.311,58.342) 163.311,58.6 163.5,58.6 176.2,58.6 177.539,57.261 177.539,41.642 178.051,41.129 178.29,41.129 178.52,40.9 v1(178.6,40.9)
  Bottom Layer w0.116: IC32.10@104.293,54.758 104.633,54.758 104.753,54.878 105.523,54.878 105.591,54.81 105.591,54.77 R76.2@105.823,54.538 ; R76.2@105.843,54.538 105.863,54.538 106.095,54.77 106.095,54.81 106.163,54.878 117.147,54.878 120.199,57.929 133.99,57.929 134.22,57.7 v1(134.3,57.7) ; v1(178.6,40.9) 178.68,40.9 178.91,41.129 186.171,41.129 187.299,40.001 189.243,40.001 189.453,40.211 189.575,40.211 189.643,40.143 189.643,39.613 ; T_J1.15@188.73,38.7 189.643,39.613 ; T_R55.2@194.53,39.425 194.298,39.657 194.298,39.752 194.23,39.819 190.547,39.819 190.413,39.685 190.1,39.685 189.956,39.83 189.86,39.83 189.643,39.613
EEM_IO.LVDS_N5: IC3.10 R13.2 T_J1.18 T_R56.2 | length 106.1
  TopLayer w0.116: IC3.10@132.058,70.517 132.399,70.517 132.518,70.397 132.909,70.397 133.042,70.53 133.78,70.53 133.848,70.598 133.848,70.638 134.08,70.87 134.12,70.87 134.52,70.47 137.65,70.47 137.871,70.249 137.871,69.91 138.1,69.68 v1(138.1,69.6)
  L4 w0.127: v1(138.1,69.6) 138.1,69.513 137.876,69.289 137.876,66.024 140.192,63.708 140.192,61.671 145.164,56.7 147.785,56.7 151.943,52.542 152.084,52.401 ccw(c152.27,52.587) 152.456,52.401 153.723,53.667 cw(c154.101,53.288) 154.48,53.667 cw(c154.101,53.288) 154.48,52.91 ; 154.479,52.909 153.042,51.472 ccw(c153.228,51.285) 153.414,51.098 154.852,52.537 cw(c155.231,52.158) 155.61,52.537 cw(c155.231,52.158) 155.61,51.78 ; 155.609,51.779 154.172,50.342 ccw(c154.358,50.155) 154.172,49.969 ccw(c154.358,50.155) 154.544,49.968 155.924,51.349 cw(c156.303,50.97) 156.682,51.349 cw(c156.303,50.97) 156.682,50.592 155.474,49.384 ccw(c155.66,49.197) 155.474,49.011 156.023,48.462 156.092,48.392 158.37,48.392 160.049,46.714 160.15,46.612 160.19,46.572 ccw(c160.376,46.759) 160.563,46.573 161,47.01 161.005,47.01 cw(c161.339,46.591) 161.717,46.97 cw(c161.339,46.591) 161.717,46.213 160.614,45.109 ccw(c160.799,44.922) 160.613,44.736 ccw(c160.799,44.922) 160.986,44.736 162.072,45.822 cw(c162.451,45.444) 162.83,45.822 cw(c162.451,45.444) 162.83,45.065 161.885,44.12 ccw(c162.071,43.934) 161.885,43.748 ccw(c162.071,43.934) 162.258,43.748 cw(c162.636,43.369) 163.015,43.748 163.404,43.359 163.505,43.258 166.664,40.098 177.502,40.098 180.028,37.572 180.806,37.572 185.576,37.572 189.756,37.572 190.136,37.192 190.136,36.6 190.354,36.382 191.048,36.382 T_J1.18@191.27,36.16
  Bottom Layer w0.116: T_J1.18@191.27,36.16 190.199,36.16 190.131,36.092 190.131,35.639 190.679,35.09 193.621,35.09 193.736,35.205 194.23,35.205 194.298,35.273 194.298,35.318 T_R56.2@194.53,35.55
EEM_IO.LVDS_N6: IC32.14 R82.2 T_J1.21 T_R57.2 | length 123.3
  TopLayer w0.116: v1(169.38,56.7) 169.38,56.62 169.61,56.39 169.61,56.121 171.939,53.792 171.939,35.492 172.692,34.739 176.792,34.739 181.092,30.439 186.518,30.439 188.338,32.259 189.122,32.259 189.363,32.501 189.665,32.501 189.733,32.433 189.733,32.083 T_J1.21@188.73,31.08
  Bottom Layer w0.116: IC32.14@103.093,53.058 103.093,52.718 103.212,52.598 103.212,52.219 103.595,51.836 103.78,51.836 103.908,51.708 103.908,51.463 104.129,51.242 104.515,51.242 R82.2@104.888,50.868 ; R82.2@104.908,50.868 104.928,50.868 105.16,51.1 105.16,51.14 105.228,51.208 116.508,51.208 121.539,56.239 135.608,56.239 137.283,57.914 169.217,57.914 169.586,57.545 169.586,57.01 169.38,56.804 v1(169.38,56.7) ; T_J1.21@188.73,31.08 189.86,32.21 189.956,32.21 190.1,32.065 190.413,32.065 190.474,32.127 194.225,32.127 194.242,32.11 194.293,32.11 194.53,31.874 T_R57.2@194.53,31.77
EEM_IO.LVDS_N7: IC3.14 R15.2 T_J1.24 T_R58.2 | length 106
  TopLayer w0.116: IC3.14@130.858,72.217 130.858,72.557 130.978,72.677 130.978,73.008 131.931,73.961 132.739,73.961 132.77,73.93 132.98,73.93 133.048,73.998 133.048,74.038 133.28,74.27 R15.2@133.3,74.27 133.32,74.27 133.552,74.038 133.552,73.998 133.62,73.93 134.354,73.93 134.382,73.903 134.918,73.903 135.148,74.132 v1(135.228,74.132)
  L4 w0.127: v1(135.228,74.132) 135.326,74.132 135.539,73.919 136.338,73.919 136.572,73.685 136.572,72.345 136.572,62.346 142.7,56.218 142.7,50.572 147.1,46.172 147.54,46.172 147.74,46.172 ccw(c147.74,46.435) 148.003,46.435 148.003,46.801 cw(c148.539,46.801) 148.539,47.337 cw(c148.539,46.801) 149.074,46.801 149.074,45.363 ccw(c149.338,45.363) 149.338,45.099 ccw(c149.338,45.363) 149.601,45.363 149.601,46.801 cw(c150.137,46.801) 150.137,47.337 cw(c150.137,46.801) 150.672,46.801 150.672,45.4 ccw(c150.936,45.4) 150.936,45.137 ccw(c150.936,45.4) 151.199,45.4 151.199,46.436 cw(c151.735,46.436) 151.735,46.971 cw(c151.735,46.436) 152.27,46.436 ccw(c152.534,46.435) 152.534,46.172 153.184,46.172 155.813,46.172 166.808,35.177 177.708,35.177 182.913,29.972 189.413,29.972 189.492,29.892 190.136,29.249 190.136,28.9 190.354,28.682 191.128,28.682 T_J1.24@191.27,28.54
  Bottom Layer w0.116: T_J1.24@191.27,28.54 191.044,28.767 190.364,28.767 190.131,29 190.131,29.412 190.401,29.682 192.812,29.682 192.957,29.538 194.092,29.538 194.21,29.42 194.303,29.42 194.53,29.193 T_R58.2@194.53,29.1
EEM_IO.LVDS_N8: IC46.48 R106.2 T_J2.3 T_R59.2 | length 121
  Bottom Layer w0.116: IC46.48@103.959,40.361 103.959,40.702 103.84,40.821 103.84,40.946 104.763,41.869 105.08,41.869 105.148,41.802 105.148,41.762 105.38,41.53 R106.2@105.4,41.53 105.42,41.53 105.652,41.762 105.652,41.802 105.72,41.869 126.494,41.869 126.702,42.078 127.098,42.078 127.306,41.869 135.739,41.869 139.009,45.14 139.143,45.273 ccw(c138.776,45.64) 139.143,46.007 138.789,46.361 cw(c138.971,46.544) 138.789,46.726 cw(c138.971,46.544) 139.153,46.727 139.507,46.372 ccw(c139.874,46.739) 140.241,46.372 140.728,46.859 142.747,48.878 142.805,48.936 142.9,49.031 142.9,50.022 ccw(c142.381,50.022) 142.381,50.541 141.357,50.541 cw(c141.357,50.799) 141.357,51.057 145.008,51.057 ccw(c145.008,51.576) 145.008,52.095 141.357,52.095 cw(c141.357,52.353) 141.357,52.611 145.008,52.611 ccw(c145.008,53.13) 145.008,53.649 143.158,53.649 cw(c143.158,53.907) 142.9,53.907 142.9,54.095 142.9,54.5 145.339,56.939 153.773,56.939 155.351,56.939 cw(c155.351,56.681) 155.609,56.681 155.609,55.7 ccw(c156.128,55.7) 156.647,55.7 156.647,56.923 cw(c156.905,56.923) 157.163,56.923 157.163,55.7 ccw(c157.682,55.7) 158.201,55.7 158.201,56.923 cw(c158.459,56.923) 158.717,56.923 158.717,55.7 ccw(c159.236,55.7) 159.755,55.7 159.755,56.923 cw(c160.013,56.923) 160.271,56.923 160.271,55.7 ccw(c160.79,55.7) 161.309,55.7 161.309,56.681 cw(c161.567,56.681) 161.567,56.939 161.756,56.939 162.095,56.939 163.934,55.1 164.246,55.1 171.006,55.1 171.48,55.1 cw(c171.48,54.892) 171.688,54.892 171.688,54.709 ccw(c171.896,54.709) 171.896,54.501 ccw(c171.896,54.709) 172.104,54.709 172.104,54.892 cw(c172.312,54.892) 172.312,55.1 172.659,55.1 174.368,55.1 174.436,55.032 174.436,54.646 ; T_J2.3@173.73,53.94 174.436,54.646 ; T_R59.2@179.53,54.476 179.298,54.708 179.298,54.778 179.23,54.845 178.621,54.845 177.792,54.845 177.598,55.039 175.526,55.039 175.413,54.925 175.1,54.925 174.956,55.07 174.86,55.07 174.436,54.646
EEM_IO.LVDS_N9: IC13.48 R27.2 T_J2.6 T_R60.2 | length 121.7
  TopLayer w0.116: IC13.48@148.65,19.369 148.65,19.029 148.531,18.909 148.531,18.681 148.792,18.419 149.227,18.419 149.559,18.087 150.192,18.087 150.528,18.423 R27.2@150.548,18.423 ; R27.2@150.791,18.16 150.829,18.122 152.794,18.122 153.653,18.122 153.75,18.219 cw(c154.117,17.852) 154.441,18.258 154.446,18.258 154.484,18.22 ; 154.484,18.219 156.261,16.442 ccw(c156.444,16.625) 156.626,16.442 ccw(c156.444,16.625) 156.626,16.807 154.408,19.025 cw(c154.775,19.392) 154.407,19.758 154.409,19.76 cw(c154.775,19.392) 155.142,19.759 157.36,17.541 ccw(c157.542,17.724) 157.725,17.541 ccw(c157.542,17.724) 157.725,17.906 155.507,20.124 cw(c155.874,20.491) 155.506,20.857 155.508,20.859 cw(c155.874,20.491) 156.241,20.858 158.459,18.64 ccw(c158.641,18.822) 158.824,18.64 ccw(c158.641,18.822) 158.824,19.005 157.047,20.782 cw(c157.414,21.149) 157.008,21.473 157.008,21.478 157.039,21.508 157.039,21.79 157.039,24.236 157.039,25.112 cw(c157.558,25.112) 157.558,25.631 157.903,25.631 ccw(c157.903,25.889) 157.903,26.147 157.023,26.147 cw(c157.023,26.666) 157.023,27.185 158.755,27.185 ccw(c158.755,27.443) 158.755,27.701 157.023,27.701 cw(c157.023,28.22) 157.023,28.739 158.755,28.739 ccw(c158.755,28.997) 158.755,29.255 157.558,29.255 cw(c157.558,29.774) 157.039,29.774 157.039,29.962 157.039,32.747 158.49,34.198 164.724,34.198 164.798,34.198 164.856,34.256 165.708,35.108 ccw(c165.526,35.291) 165.708,35.474 ; 165.708,35.474 165.633,35.549 cw(c166,35.916) 165.632,36.281 165.634,36.284 cw(c166,35.916) 166.367,36.283 167.783,34.867 ccw(c167.966,35.049) 168.148,34.867 ccw(c167.966,35.049) 168.148,35.231 166.732,36.647 cw(c167.099,37.014) 166.732,37.381 cw(c167.099,37.014) 167.466,37.381 168.882,35.965 ccw(c169.064,36.148) 169.247,35.965 ccw(c169.064,36.148) 169.247,36.33 167.831,37.746 cw(c168.198,38.113) 167.83,38.479 167.832,38.481 cw(c168.198,38.113) 168.565,38.48 169.745,37.3 ccw(c169.928,37.482) 170.11,37.3 ccw(c169.928,37.482) 170.11,37.665 169.541,38.233 cw(c170.103,38.794) 169.31,38.795 169.31,39.191 169.31,43.209 169.31,43.942 ccw(c169.052,43.942) 169.052,44.2 166.532,44.2 cw(c166.532,44.719) 166.532,45.238 169.523,45.238 ccw(c169.523,45.496) 169.523,45.754 166.532,45.754 cw(c166.532,46.273) 166.532,46.792 169.052,46.792 ccw(c169.052,47.05) 169.31,47.05 169.31,48.016 169.31,49.19 169.08,49.42 v1(169.08,49.5)
  Bottom Layer w0.116: v1(169.08,49.5) 169.08,49.58 169.31,49.81 169.31,51.279 170.863,52.832 174.744,52.832 175.163,52.414 175.163,51.668 175.364,51.467 176.204,51.467 T_J2.6@176.27,51.4 175.986,51.116 175.256,51.116 175.179,51.039 175.179,50.421 175.34,50.26 179.21,50.26 179.53,50.58 T_R60.2@179.53,50.6
EEM_IO.LVDS_N10: IC46.4 R114.2 T_J2.9 T_R61.2 | length 121.6
  Bottom Layer w0.116: IC46.4@104.659,38.161 105.009,38.161 105.079,38.231 107.426,38.231 107.494,38.163 107.494,38.123 107.726,37.891 R114.2@107.746,37.891 107.766,37.891 107.998,38.123 107.998,38.163 108.066,38.231 129.3,38.231 129.592,37.939 136.108,37.939 140.644,42.475 141.255,43.086 ccw(c140.888,43.453) 141.255,43.82 ; 141.255,43.82 cw(c141.438,44.003) 141.255,44.185 cw(c141.438,44.003) 141.62,44.185 143.066,42.74 ccw(c143.433,43.107) 143.799,42.739 ; 143.8,42.74 ccw(c143.433,43.107) 143.799,43.474 142.196,45.078 cw(c142.379,45.259) 142.196,45.442 cw(c142.379,45.259) 142.562,45.441 144.178,43.825 ; 144.178,43.825 ccw(c144.545,44.192) 144.87,43.786 144.874,43.786 144.95,43.863 144.95,43.867 ccw(c144.545,44.192) 144.95,44.516 144.95,44.52 143.295,46.176 cw(c143.478,46.358) 143.295,46.54 cw(c143.478,46.358) 143.661,46.54 145.276,44.924 ccw(c145.644,45.29) 146.011,44.923 ccw(c145.644,45.29) 146.049,45.615 146.049,45.619 145.101,46.568 cw(c145.284,46.75) 145.101,46.932 145.235,47.065 145.769,47.6 158.286,47.6 159.253,47.6 cw(c159.253,47.342) 159.511,47.342 159.511,46.213 ccw(c160.03,46.213) 160.549,46.213 160.549,48.342 cw(c160.807,48.342) 161.065,48.342 161.065,46.213 ccw(c161.584,46.213) 162.103,46.213 162.103,48.342 cw(c162.361,48.342) 162.619,48.342 162.619,46.213 ccw(c163.138,46.213) 163.657,46.213 163.657,48.342 cw(c163.915,48.342) 164.173,48.342 164.173,46.213 ccw(c164.692,46.213) 165.211,46.213 165.211,48.342 cw(c165.469,48.342) 165.727,48.342 165.727,46.213 ccw(c166.246,46.213) 166.765,46.213 166.765,47.342 cw(c167.023,47.342) 167.023,47.6 167.212,47.6 171.127,47.6 171.551,47.6 cw(c171.551,47.417) 171.734,47.417 171.734,47.398 ccw(c171.917,47.398) 172.1,47.398 172.1,47.417 cw(c172.283,47.417) 172.283,47.6 172.386,47.6 172.501,47.485 172.75,47.485 174.539,47.485 174.607,47.417 174.607,47.197 ; T_J2.9@174.05,46.654 173.73,46.654 T_J2.9@173.73,46.32 174.057,46.647 174.607,47.197 ; T_R61.2@179.53,46.976 179.298,47.208 179.298,47.278 179.165,47.41 175.205,47.41 175.165,47.45 174.86,47.45 174.607,47.197
EEM_IO.LVDS_N11: IC13.4 R31.2 T_J2.12 T_R62.2 | length 121.9
  TopLayer w0.116: IC13.4@149.35,21.569 149.69,21.569 149.81,21.449 151.799,21.449 151.867,21.517 151.867,21.546 152.065,21.745 R31.2@152.119,21.745 ; R31.2@152.119,21.778 R31.2@152.139,21.778 ; R31.2@152.362,21.515 152.439,21.439 153.939,21.439 155.6,23.1 155.739,23.239 155.739,23.289 ccw(c155.481,23.289) 155.481,23.547 155.258,23.547 cw(c155.258,24.066) 154.739,24.066 cw(c155.258,24.066) 155.258,24.584 155.619,24.584 ccw(c155.619,24.842) 155.877,24.842 ccw(c155.619,24.842) 155.619,25.1 155.258,25.1 cw(c155.258,25.619) 154.739,25.619 cw(c155.258,25.619) 155.258,26.138 155.619,26.138 ccw(c155.619,26.396) 155.877,26.396 ccw(c155.619,26.396) 155.619,26.654 155.258,26.654 cw(c155.258,27.173) 154.739,27.173 cw(c155.258,27.173) 155.258,27.692 155.619,27.692 ccw(c155.619,27.95) 155.877,27.95 ccw(c155.619,27.95) 155.619,28.208 155.258,28.208 cw(c155.258,28.727) 154.739,28.727 cw(c155.258,28.727) 155.258,29.246 155.619,29.246 ccw(c155.619,29.504) 155.877,29.504 ccw(c155.619,29.504) 155.619,29.762 155.258,29.762 cw(c155.258,30.281) 154.739,30.281 cw(c155.258,30.281) 155.258,30.8 155.481,30.8 ccw(c155.481,31.058) 155.739,31.058 155.739,31.735 155.739,31.977 155.739,33.585 155.739,33.861 155.251,34.349 ccw(c155.069,34.166) 154.811,34.166 154.811,34.162 cw(c154.292,34.162) 154.292,33.643 cw(c154.292,34.162) 153.773,34.162 153.773,34.642 ccw(c153.515,34.642) 153.515,34.9 152.661,34.9 152.549,34.788 152.461,34.7 152.461,31.892 151.708,31.139 150.561,31.139 149.439,32.261 149.439,32.607 149.439,32.795 ccw(c149.181,32.795) 149.181,33.053 145.282,33.053 cw(c145.282,33.572) 145.282,34.091 150.559,34.091 ccw(c150.559,34.349) 150.559,34.607 149.958,34.607 cw(c149.958,35.126) 149.439,35.126 149.439,35.65 149.439,35.73 149.493,35.784 149.66,35.951 150.882,35.951 151.392,36.461 152.014,36.461 152.203,36.461 ccw(c152.203,36.719) 152.461,36.719 152.461,37.365 cw(c152.98,37.365) 153.499,37.365 153.499,36.719 ccw(c153.757,36.719) 153.757,36.461 154.492,36.461 155.708,36.461 157.269,34.9 158.411,34.9 158.599,34.9 ccw(c158.599,35.158) 158.857,35.158 158.857,35.239 cw(c159.376,35.239) 159.895,35.239 159.895,34.953 ccw(c160.153,34.953) 160.411,34.953 160.411,35.958 cw(c160.93,35.958) 161.449,35.958 161.449,35.158 ccw(c161.707,35.158) 161.707,34.9 162.4,34.9 162.511,34.9 162.953,35.342 163.087,35.476 ccw(c162.904,35.658) 163.087,35.84 161.924,37.003 cw(c162.291,37.37) 161.924,37.737 cw(c162.291,37.37) 162.658,37.737 164.388,36.008 ccw(c164.57,36.19) 164.752,36.008 ccw(c164.57,36.19) 164.752,36.372 163.055,38.07 cw(c163.422,38.437) 163.055,38.804 cw(c163.422,38.437) 163.789,38.804 165.469,37.124 ccw(c165.651,37.306) 165.834,37.124 ccw(c165.651,37.306) 165.834,37.488 cw(c166.201,37.856) 165.834,38.223 166.912,39.301 167.609,39.998 167.609,42.49 167.38,42.72 v1(167.38,42.8)
  Bottom Layer w0.116: v1(167.38,42.8) 167.38,42.88 167.609,43.11 167.609,44.479 168.292,45.161 168.402,45.161 169.157,45.161 ccw(c169.157,45.419) 169.415,45.419 169.415,45.642 cw(c169.934,45.642) 170.453,45.642 170.453,41.389 ccw(c170.711,41.389) 170.969,41.389 170.969,45.642 cw(c171.488,45.642) 172.007,45.642 172.007,45.419 ccw(c172.265,45.419) 172.265,45.161 173.231,45.161 174.878,45.161 175.131,44.908 175.131,44.3 175.388,44.043 176.007,44.043 T_J2.12@176.27,43.78 176.124,43.633 175.364,43.633 175.131,43.4 175.131,42.969 175.4,42.7 178.721,42.7 178.827,42.805 179.33,42.805 179.398,42.873 179.398,42.918 T_R62.2@179.63,43.15
EEM_IO.LVDS_N12: IC46.10 R121.2 T_J2.15 T_R63.2 | length 122.4
  Bottom Layer w0.116: IC46.10@104.659,35.161 105.609,35.161 105.779,35.331 106.526,35.331 106.594,35.263 106.594,35.223 106.826,34.991 R121.2@106.846,34.991 106.866,34.991 107.098,35.223 107.098,35.263 107.166,35.331 113.893,35.331 114.081,35.331 ccw(c114.081,35.85) 114.6,35.85 114.6,36.073 cw(c114.858,36.073) 115.116,36.073 115.116,34.85 ccw(c115.635,34.85) 116.154,34.85 116.154,36.073 cw(c116.412,36.073) 116.67,36.073 116.67,34.85 ccw(c117.189,34.85) 117.708,34.85 117.708,35.073 cw(c117.966,35.073) 117.966,35.331 118.545,35.331 125.5,35.331 125.654,35.177 139.244,35.177 141.266,35.177 cw(c141.266,34.919) 141.524,34.919 141.524,33.751 ccw(c142.043,33.751) 142.562,33.751 142.562,35.246 cw(c142.82,35.246) 143.078,35.246 143.078,33.751 ccw(c143.597,33.751) 144.116,33.751 144.116,35.246 cw(c144.374,35.246) 144.632,35.246 144.632,33.751 ccw(c145.151,33.751) 145.67,33.751 145.67,35.246 cw(c145.928,35.246) 146.186,35.246 146.186,33.751 ccw(c146.705,33.751) 147.224,33.751 147.224,35.246 cw(c147.482,35.246) 147.74,35.246 147.74,33.751 ccw(c148.259,33.751) 148.778,33.751 148.778,35.246 cw(c149.036,35.246) 149.294,35.246 149.294,33.751 ccw(c149.813,33.751) 150.332,33.751 150.332,35.246 cw(c150.59,35.246) 150.848,35.246 150.848,33.751 ccw(c151.367,33.751) 151.886,33.751 151.886,34.919 cw(c152.144,34.919) 152.144,35.177 152.333,35.177 158.92,35.177 159.541,35.799 159.541,36.25 162.134,38.842 162.382,39.09 ; 162.382,39.09 ccw(c161.82,39.65) 162.613,39.65 162.613,41.399 cw(c162.871,41.399) 162.871,41.657 cw(c162.871,41.399) 163.129,41.399 163.129,39.419 ccw(c163.648,39.419) 163.648,38.9 ccw(c163.648,39.419) 164.167,39.419 164.167,41.399 cw(c164.425,41.399) 164.425,41.657 cw(c164.425,41.399) 164.683,41.399 164.683,40.419 ccw(c165.202,40.419) 165.202,39.9 165.659,39.9 165.901,39.9 174.142,39.9 174.403,40.161 174.625,40.161 174.693,40.093 174.693,39.997 173.73,39.034 T_J2.15@173.73,38.7 174.86,39.83 174.956,39.83 175.1,39.685 175.413,39.685 175.543,39.815 177.115,39.815 177.385,39.545 179.23,39.545 179.298,39.478 179.298,39.408 T_R63.2@179.53,39.176